# Altium PCB BLE_product-v1.0(Updated Power Jack).PcbDoc (part 1 of 2)
Units mil, origin at the board's own origin, x right, y up, seen from the top; angles counter-clockwise.
Board outline 472.44 x 507.34 mil, 4 copper layers (Top Layer, Layer 2, Layer 3, Bottom Layer), stack 39.334 mil thick; 45 components, 33 nets, 183 pads, 87 vias.
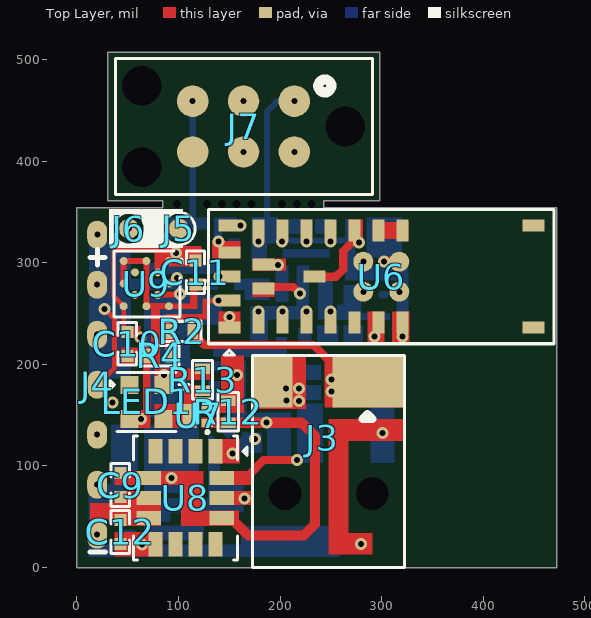
[diagram p0: Top Layer view]
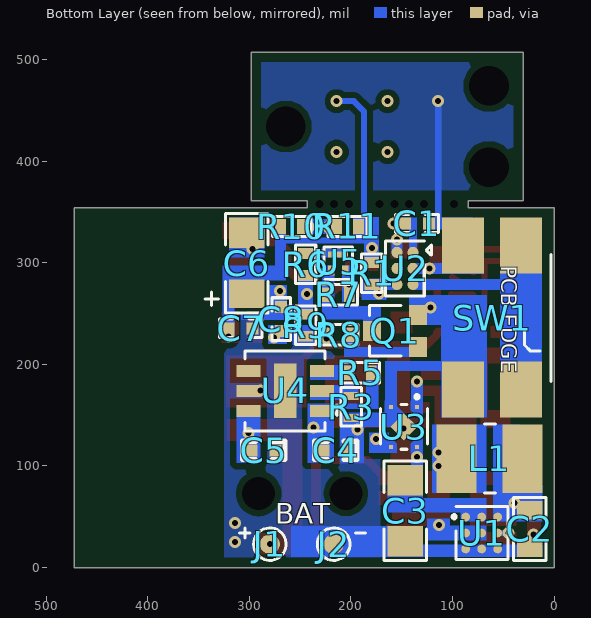
[diagram p1: Bottom Layer view, seen from below]
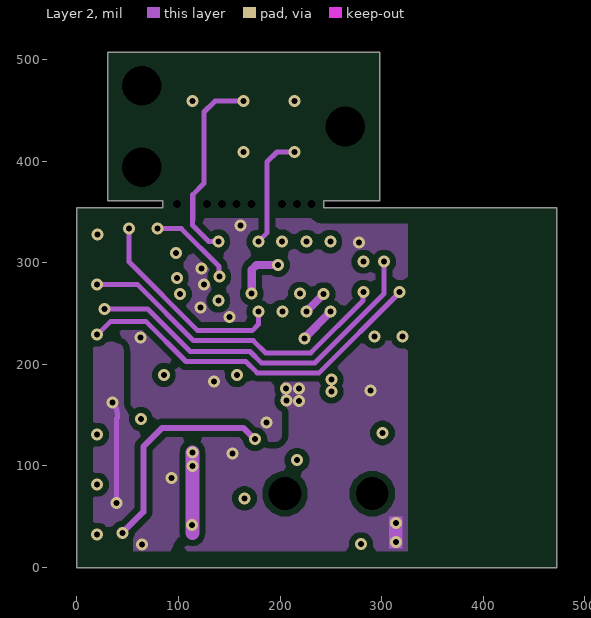
[diagram p2: Layer 2]
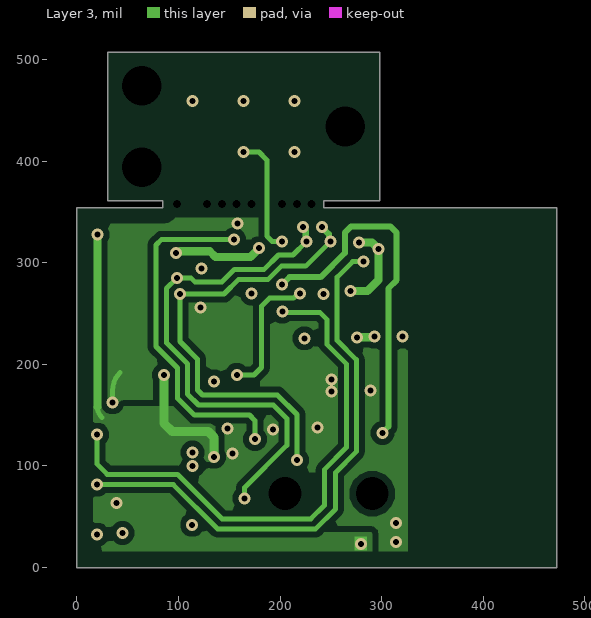
[diagram p3: Layer 3]
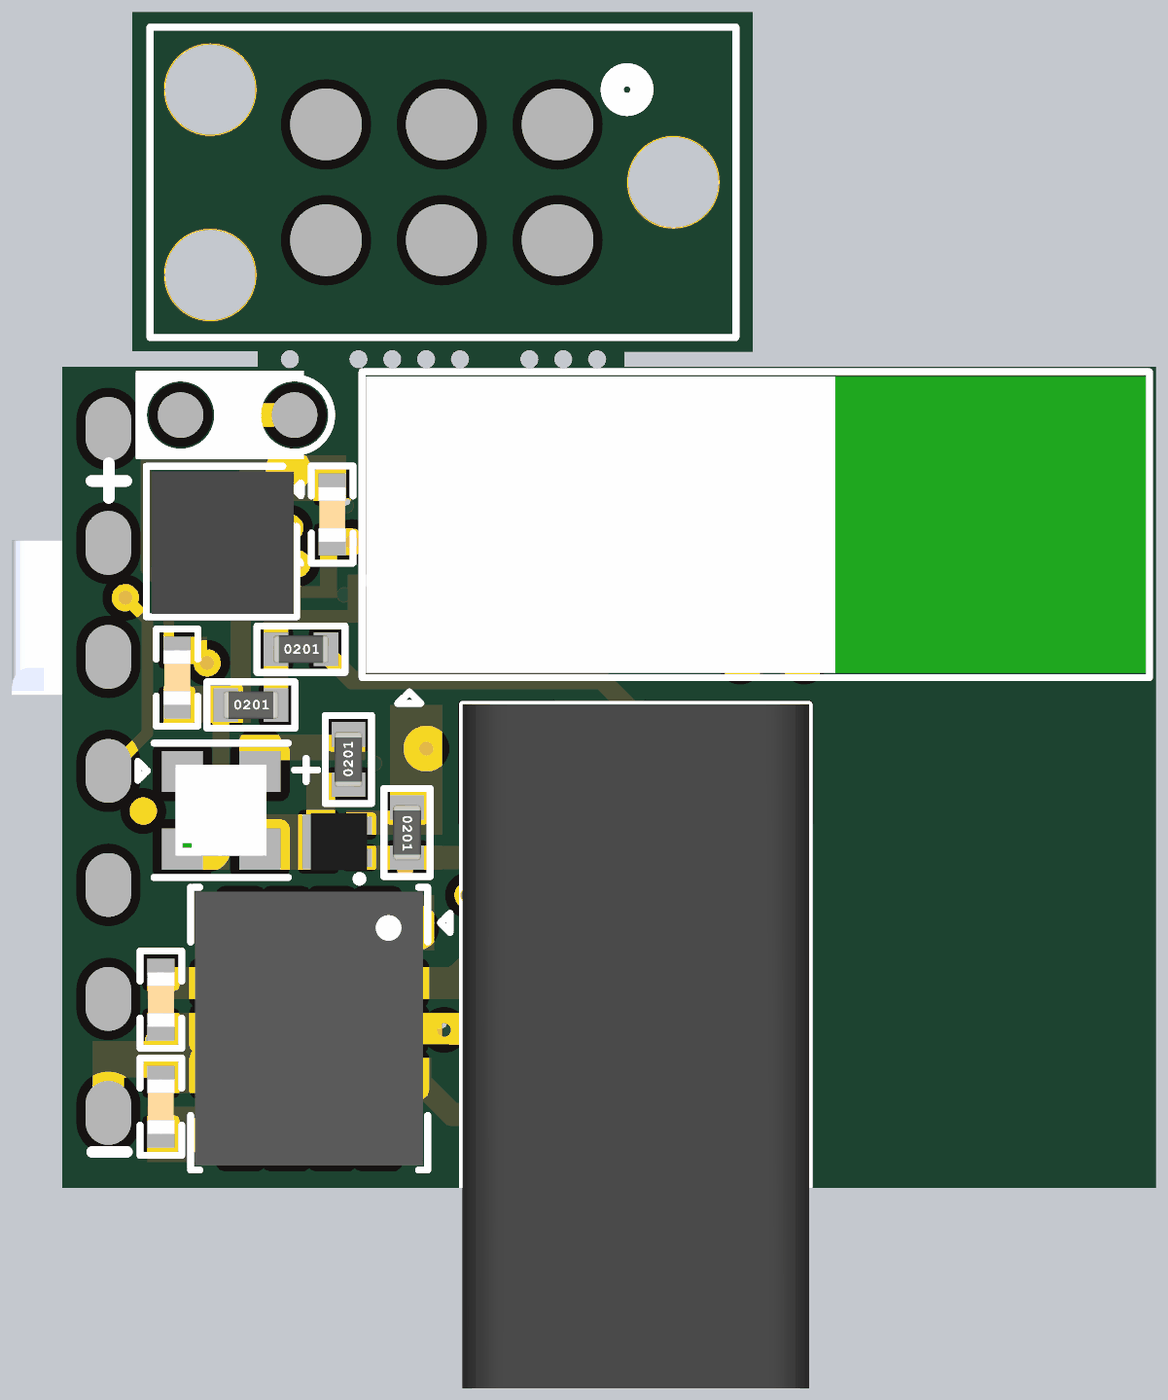
[diagram p4: 3D render of the assembled board from above, using the file's embedded part models]
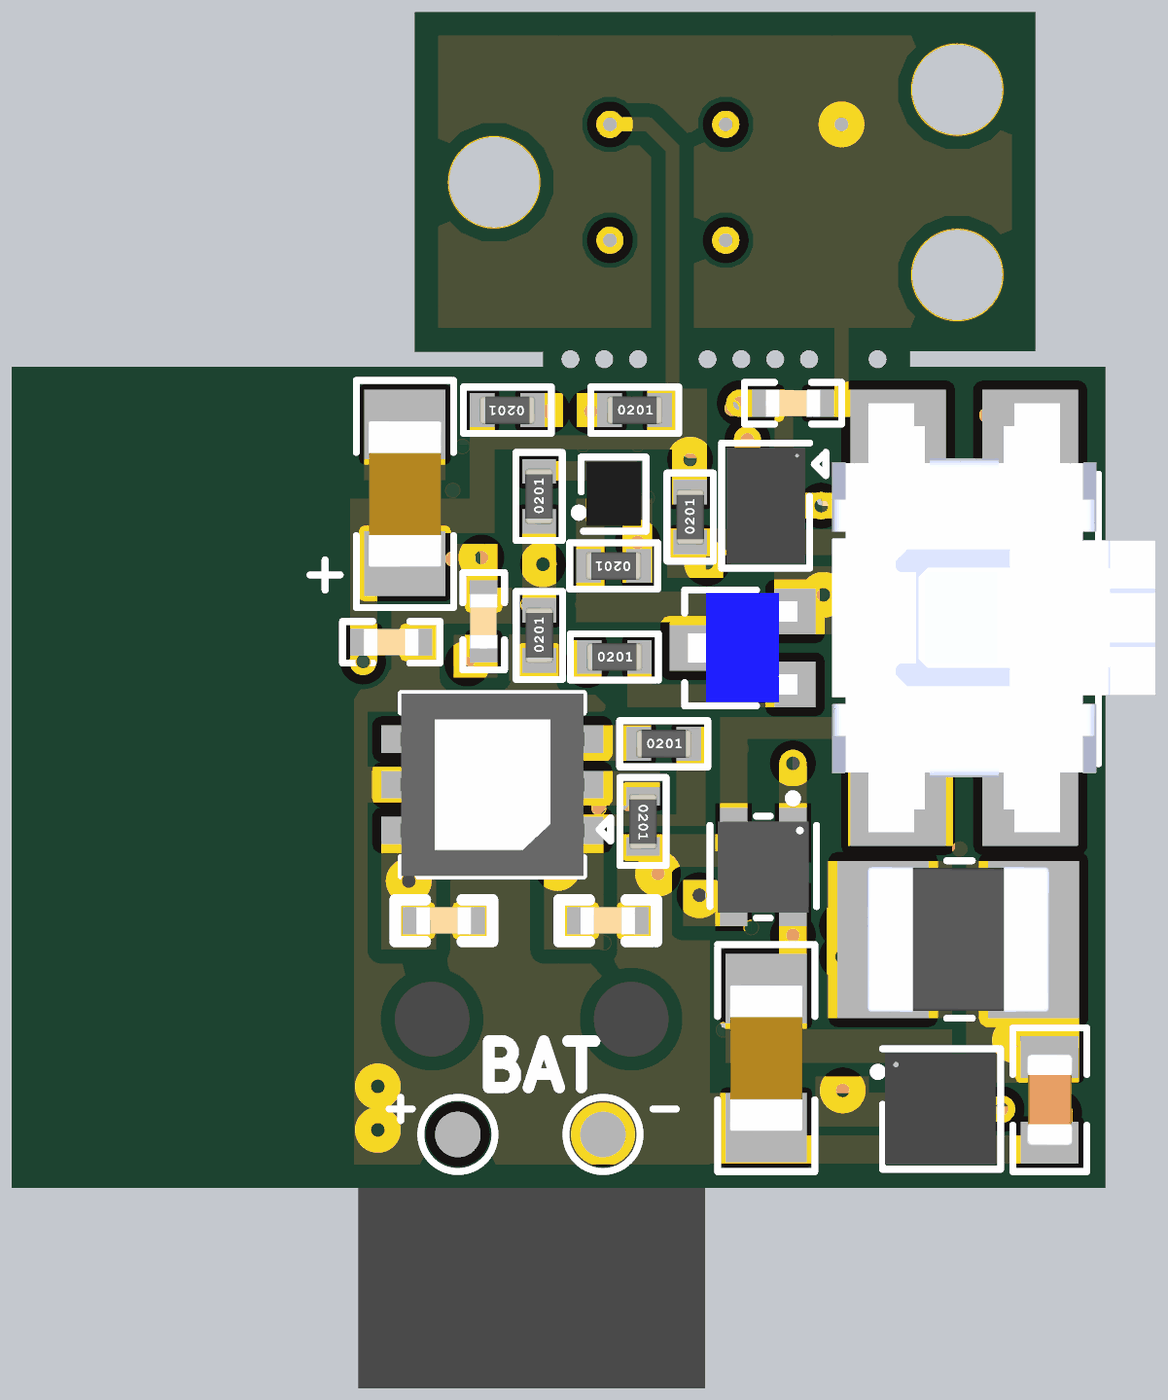
[diagram p5: 3D render of the assembled board from below, using the file's embedded part models]

## Layer stack, top to bottom
Top Solder: solder mask 0.4, Solder Resist, Dk 3.5
Top Layer: signal copper 1.378
Dielectric 2: prepreg 5.1, PP-017, Dk 4.3
Layer 2: signal copper 1.378
Dielectric 1: dielectric 23.622, FR-4, Dk 4.8
Layer 3: signal copper 1.378
Dielectric 3: prepreg 5.1, PP-017, Dk 4.3
Bottom Layer: signal copper 1.378
Bottom Solder: solder mask 0.4, Solder Resist, Dk 3.5

## Board outline
0,0 0,354.33 84.47,354.33 84.47,361 30.33,361 30.33,507.34 298.25,507.34 298.25,360.92 242.75,360.92 242.75,354.33 472.44,354.33 472.44,0

## Design rules (kind name [scope] priority, off if disabled: settings)
BoardOutlineClearance BoardOutlineClearance_OUTER [(OnLayer('Top Layer') OR OnLayer('Bottom Layer'))] p1: gap=9.84 ignorepadtopadclearanceinfootprint=FALSE except(0: Arc-SplitContinuation Track-SplitContinuation SMDPad-SplitContinuation THPad-SplitContinuation Via-SplitContinuation Fill-SplitContinuation Poly-SplitContinuation Region-SplitContinuation Text-SplitContinuation)
BoardOutlineClearance BoardOutlineClearance_INNER [(OnLayer('Layer 2') OR OnLayer('Layer 3'))] p2: gap=15.75 ignorepadtopadclearanceinfootprint=FALSE except(0: Arc-SplitContinuation Track-SplitContinuation SMDPad-SplitContinuation THPad-SplitContinuation Via-SplitContinuation Fill-SplitContinuation Poly-SplitContinuation Region-SplitContinuation Text-SplitContinuation)
Clearance Clearance_LAYER3 [OnLayer('Layer 3')] p1: gap=4.92 ignorepadtopadclearanceinfootprint=FALSE except(6: Arc-Poly Track-Poly SMDPad-Poly THPad-Poly Via-Poly Fill-Poly Poly-Poly)
Clearance Clearance_LAYER2 [OnLayer('Layer 2')] p2: gap=4.92 ignorepadtopadclearanceinfootprint=FALSE except(6: Arc-Poly Track-Poly SMDPad-Poly THPad-Poly Via-Poly Fill-Poly Poly-Poly)
Clearance Clearance_BOTTOM [OnLayer('Bottom Layer')] p3: gap=3.54 ignorepadtopadclearanceinfootprint=FALSE except(6: Arc-Poly Track-Poly SMDPad-Poly THPad-Poly Via-Poly Fill-Poly Poly-Poly)
Clearance Clearance_TOP [OnLayer('Top Layer')] p4: gap=3.54 ignorepadtopadclearanceinfootprint=FALSE except(6: Arc-Poly Track-Poly SMDPad-Poly THPad-Poly Via-Poly Fill-Poly Poly-Poly)
ComponentClearance [All] p1: gap=0 collisioncheckmode=3 verticalgap=0 showdistances=FALSE
HoleToHoleClearance [All] p1: gap=5 allowstackedmicrovias=TRUE
MinimumSolderMaskSliver [All] p1: minsoldermaskwidth=0
PolygonConnect PolygonConnect_TOP [HasFootprint('TC2030-IDC-NL_')] p1: connectstyle=Relief reliefconductorwidth=5 reliefentries=4 polygonreliefangle="90 Angle" airgapwidth=5
PolygonConnect [All] p2: connectstyle=Direct reliefconductorwidth=4 reliefentries=4 polygonreliefangle="90 Angle" airgapwidth=4
RoutingVias [All] p1: holewidth=5.91 width=11.81 viastyle="Through Hole" minholewidth=5.91 minwidth=11.81 maxholewidth=5.91 maxwidth=11.81
SilkToSilkClearance [All] p1: silktosilkclearance=0
SilkToSolderMaskClearance [IsPad] p1: minsilkscreentomaskgap=0 clearancetoexposedcopper=TRUE
SolderMaskExpansion [All] p1: expansion=4 istentingtop=FALSE
Width [All] p1: maxlimit=15 minlimit=3.54 preferedwidth=5.91 midlayer1_minwidth=4.92 midlayer2_minwidth=4.92 minimp=50.000000 maximp=50.000000 favimp=50.000000
25 further rules are at their usual default settings.

## Classes and differential pairs
component class U_Power_Sheet: C1 C2 C3 C4 C5 J1 J2 J3 L1 Q1 R1 R2 R3 R4 R5 R6 R7 R8 R9 SW1 U1 U2 U3 U4 U5
component class U_IMU_Sensor_Sheet: C9 C10 C11 C12 U8 U9
component class U_BLE_Module_Sheet: 2 C6 C7 C8 J4 J5 J6 J7 LED1 R10 R11 R12 R13 U6 U7

## Components (designator, comment, footprint, x,y, rotation, side; value= is the part's Value field where it differs from the comment)
C1 "0.1uF" CAP-0201 134.92,338.65 r0 bottom
C2 "10uF" Cap-0402 24.04,37.93 r90 bottom
C3 "22uF" Cap-0603 146.51,55.93 r90 bottom
C4 "1uF" CAP-0201 214.93,115.26 r0 bottom
C5 "2.2uf" CAP-0201 285.73,115.26 r0 bottom value=2.2uF
C6 "100uF" F980J107MMAAXE 302.53,269.45 r90 bottom
C7 "0.1uF" CAP-0201 308.43,235.45 r0 bottom
C8 "1uF" CAP-0201 268.54,244.5 r270 bottom
C9 "0.1uF" CAP-0201 42.69,81.19 r90 top
C10 "0.1uF" CAP-0201 49.66,220.2 r90 top
C11 "0.1uF" CAP-0201 116.67,290.58 r90 top
C12 "0.1uF" CAP-0201 42.69,34.98 r270 top
J1 "1 Sensor Pad 0.5mm" "1 Sensor Pad 0.5mm" 279.67,22.97 r180 bottom
J2 "1 Sensor Pad 0.5mm" "1 Sensor Pad 0.5mm" 217,22.97 r180 bottom
J3 "DC-096" DC-096 241.73,127.87 r270 top
J4 "Sensor Pads 0.5mm Dia" "Sensor-Pads 0.5mm Dia" 20,179.91 r270 top locked
J5 "1 Sensor Pad 0.5mm" "1 Sensor Pad 0.5mm" 100.42,333.51 r90 top
J6 "1 Sensor Pad 0.5mm" "1 Sensor Pad 0.5mm" 51.21,333.51 r90 top
J7 "TC2030-IDC-NL" TC2030-IDC-NL_ 164,434 r180 top
L1 "470nH" IND-0806 63.54,107.14 r180 bottom
LED1 "XL-1010RGBC-WS2812B" XL-1010RGBC-WS2812B 68.7,162.91 r0 top
Q1 "MMBT3904M" SOT-723 156.73,233 r90 bottom
R1 "10K" Res-0201#1 179.37,289.49 r90 bottom
R2 "22K" Res-0201#1 103.2,232.4 r0 top
R3 "10K" Res-0201#2 199.73,158.06 r270 bottom
R4 "33k" Res-0201#1 81.55,208.37 r0 top
R5 "10K" Res-0201#1 190.75,191.62 r180 bottom
R6 "100K" Res-0201#1 244.57,298.38 r90 bottom
R7 "4.7K" Res-0201#1 212.39,268.42 r0 bottom
R8 "4.7K" Res-0201#1 212.07,229.09 r180 bottom
R9 "100K" Res-0201#1 244.49,238.41 r90 bottom
R10 "4.7K" Res-0201#1 258.3,335.65 r0 bottom
R11 "4.7K" Res-0201#1 203.31,335.65 r180 bottom
R12 "10K" Res-0201#1 148.97,153.32 r270 top
R13 "10K" Res-0201#1 123.67,184.83 r90 top
SW1 "EVQ-P7A01P" EVQP7A01P 61,246 r90 bottom locked
U1 "FAN48610UC50X" "WLCSP-9 (1.22x1.22)" 71.29,33.97 r180 bottom
U2 "MAX16150AWT+" WLP-6(0.83x1.24) 146.76,294.41 r270 bottom
U3 "TLV73330PDQNR" X2-SON-4(1x1) 147.78,138.38 r270 bottom
U4 "FAN54120UC420X" DFN-6-EP(2x2) 264.76,173.93 r0 bottom
U5 "CSD25501F3" PicoStar-3 212.41,300.39 r180 bottom
U6 "EYSHSNZWZ" EYSHSNZWZ 299.58,286.24 r0 top locked
U7 "NTNS3193NZT5G" X-LLGA-3 119.56,149.32 r90 top
U8 "BMI323" "14-LGA (2.5x3)" 106.71,68.64 r270 top locked
U9 "BMM150" "12-WLCSP (1.56x1.56)" 68.35,279.43 r0 top locked

## Footprints (in the part's own frame and the unit in brackets; to place one, negate y for a bottom-side part, rotate by r counter-clockwise, add the part's x,y. Pads: shape width x height; smd on the part's side, far side on the other; paste and mask are expansions set on the pad)
"1 Sensor Pad 0.5mm" [mm]
  round 0.5 smd: 1(0,0)
  silkscreen extent -0.41,-0.41 0.4,0.41
"12-WLCSP (1.56x1.56)" [mm]
  round 0.2 smd mask+0.05: A1(0.566,0.566) A3(0.566,0) A5(0.566,-0.566) B2(0.283,0.283) B4(0.283,-0.283) C1(0,0.566) C5(0,-0.566) D2(-0.283,0.283) D4(-0.283,-0.283) E1(-0.566,0.566) E3(-0.566,0) E5(-0.566,-0.566)
  silkscreen extent -0.81,-0.84 0.89,0.81, body extent -0.75,-0.81 0.81,0.75, height 0.6
"14-LGA (2.5x3)" [mm]
  rect 0.61x0.35 smd: 1(-1.16,0.75) 2(-1.16,0.25) 3(-1.16,-0.25) 4(-1.16,-0.75) 8(1.16,-0.75) 9(1.16,-0.25) 10(1.16,0.25) 11(1.16,0.75)
  rect 0.35x0.61 smd: 5(-0.5,-0.91) 6(0,-0.91) 7(0.5,-0.91) 12(0.5,0.91) 13(0,0.91) 14(-0.5,0.91)
  silkscreen extent -1.55,-1.3 1.55,1.3, body extent -1.5,-1.25 1.5,1.25, height 0.86
CAP-0201 [mm]
  rect 0.3x0.3 smd mask+0.055: 1(-0.3,0) 2(0.3,0)
  silkscreen extent -0.53,-0.23 0.53,0.23, body extent -0.3,-0.15 0.3,0.15, height 0.28
Cap-0402 [mil]
  rect 18x25 smd mask+2.36: 1(-18.5,0) 2(18.5,0)
  silkscreen extent -31,-16 31,16, body extent -20,-10 20,10, height 19
Cap-0603 [mil]
  rect 30x35 smd mask+2.36: 1(-30,0) 2(30,0)
  silkscreen extent -49,-21 49,21, body extent -32,-16 31,16, height 34
DC-096 [mm]
  rect 1.3x1.8 smd mask+0.05: 1(-1.4,1.154)
  rect 1.3x1 smd mask+0.05: 2(-1.4,-1.246)
  round 0 hole 0.82 unplated mask+0.05: MH(1.4,1.246) MH(1.4,-0.937)
  silkscreen extent -2.05,-1.75 -0.46,2.05, body extent -2.05,-1.75 5.45,2.05, height 3.8
DFN-6-EP(2x2) [mm]
  rect 0.6x0.3 smd: 1(-0.917,0.5) 2(-0.917,0) 3(-0.917,-0.5) 4(0.918,-0.5) 5(0.918,0) 6(0.918,0.5)
  rect 0.56x1.37 smd: 7(0,0)
  silkscreen extent -1,-1 1,1, body extent -1.01,-1 1.01,1, height 0.76
EVQP7A01P [mm]
  rect 1.4x1.05 smd: 1(-1.8,0.725) 1(1.8,0.725) 2(-1.8,-0.725) 2(1.8,-0.725)
  silkscreen extent -1.6,-1.47 1.57,-0.81, body extent -2.35,-2.1 2.35,1.45, height 1.35
EYSHSNZWZ [mm]
  rect 0.55x0.3 smd: 1(-3.8,-1.275) 18(-3.8,1.275) 19(-3.8,0.6) 20(-3.8,0) 21(-3.8,-0.6) 22(-2.95,-0.3) 25(-2.95,0.3) 26(-1.675,0) 27(3.8,-1.275) 28(3.8,1.275)
  rect 0.3x0.55 smd: 2(-3.075,-1.15) 3(-2.475,-1.15) 4(-1.875,-1.15) 5(-1.275,-1.15) 6(-0.675,-1.15) 7(-0.075,-1.15) 8(0.525,-1.15) 11(0.525,1.15) 12(-0.075,1.15) 13(-0.675,1.15) 14(-1.275,1.15) 15(-1.875,1.15) 16(-2.475,1.15) 17(-3.075,1.15)
  round 0.5 smd: 9(0.45,-0.375) 10(0.45,0.375) 23(-0.45,-0.375) 24(-0.45,0.375)
  silkscreen extent -4.32,-1.68 4.32,1.68, body extent -4.28,-1.63 4.28,1.63, height 0.85
F980J107MMAAXE [mil]
  rect 28x35 smd mask+2.36: 1(0,0)
  rect 30x35 smd mask+2.36: 2(60,0)
  silkscreen extent -19,-21 79,21, body extent -2,-16 61,16, height 34
IND-0806 [mm]
  rect 1x1.72 smd: 1(-0.825,0) 2(0.825,0)
  silkscreen extent -0.13,-0.86 0.15,0.86, body extent -1,-0.8 1,0.8, height 1.2
PicoStar-3 [mm]
  rect 0.152x0.25 smd mask+0.05: 1(-0.175,-0.2) 2(0.175,-0.2)
  rect 0.5x0.152 smd mask+0.05: 3(0,0.2)
  silkscreen extent -0.41,-0.43 0.36,0.38, body extent -0.3,-0.38 0.3,0.32, height 0.2
Res-0201#1 [mm]
  rect 0.27x0.37 smd mask+0.055: 1(-0.275,0) 2(0.275,0)
  silkscreen extent -0.48,-0.25 0.48,0.25, body extent -0.3,-0.15 0.3,0.15, height 0.29
Res-0201#2 [mm]
  rect 0.203x0.37 smd mask+0.055: 1(-0.275,0) 2(0.275,0)
  silkscreen extent -0.48,-0.25 0.48,0.25, body extent -0.3,-0.15 0.3,0.15, height 0.29
"Sensor-Pads 0.5mm Dia" [mm]
  oval 0.7x0.5 smd: 1(-3.75,0) 2(-2.5,0) 3(-1.25,0) 4(0,0) 5(1.25,0) 6(2.5,0) 7(3.75,0)
SOT-723 [mm]
  rect 0.5x0.45 smd: 1(-0.4,-0.575) 2(0.4,-0.575) 3(0,0.575)
  silkscreen extent -0.64,-0.15 0.64,0.64, body extent -0.6,-0.6 0.6,0.6, height 0.5
TC2030-IDC-NL_ [mil]
  round 30.98 smd: 1(-50,-25) 1(-50,-25) 2(-50,25) 3(0,-25) 4(0,25) 5(50,-25) 6(50,25)
  round 0 hole 39.02: MP1(-100,0) MP2(100,40) MP3(100,-40)
  silkscreen extent -127,-67 126,67
"WLCSP-9 (1.22x1.22)" [mm]
  round 0.218 smd mask+0.055: A1(-0.4,0.4) A2(0,0.4) A3(0.4,0.4) B1(-0.4,0) B2(0,0) B3(0.4,0) C1(-0.4,-0.4) C2(0,-0.4) C3(0.4,-0.4)
  silkscreen extent -0.71,-0.66 0.66,0.66, body extent -0.61,-0.61 0.61,0.61, height 0.59
WLP-6(0.83x1.24) [mm]
  round 0.28 smd mask+0.055: A1(-0.4,0.2) A2(0,0.2) A3(0.4,0.2) B1(-0.4,-0.2) B2(0,-0.2) B3(0.4,-0.2)
  silkscreen extent -0.69,-0.48 0.69,0.66, body extent -0.64,-0.43 0.64,0.43, height 0.69
X2-SON-4(1x1) [mm]
  rect 0.1x0.1 smd paste-1 mask+0: 1(-0.5,0.325) 2(-0.5,-0.325) 3(0.5,-0.325) 4(0.5,0.325)
  rect 0.48x0.48 smd rot 135: 5(0,0)
  Top Layer region: 0.42,0.175 0.22,0.375 0.22,0.475 0.65,0.475 0.65,0.175
  Top Layer region: 0.22,-0.475 0.22,-0.375 0.42,-0.175 0.65,-0.175 0.65,-0.475
  Top Layer region: -0.65,-0.475 -0.65,-0.175 -0.42,-0.175 -0.22,-0.375 -0.22,-0.475
  Top Layer region: -0.42,0.175 -0.65,0.175 -0.65,0.475 -0.12,0.475
  silkscreen extent -0.78,-0.58 0.56,0.58, body extent -0.5,-0.5 0.5,0.5, height 0.58
X-LLGA-3 [mm]
  rect 0.2x0.28 smd mask+0.05: 1(-0.175,-0.222) 2(0.175,-0.222)
  rect 0.6x0.35 smd mask+0.05: 3(0,0.223)
  silkscreen extent -0.43,-0.25 -0.38,-0.2, body extent -0.31,-0.31 0.31,0.31, height 0.29
XL-1010RGBC-WS2812B [mm]
  rect 0.45x0.45 smd: 1(-0.425,0.425) 2(0.425,0.425) 3(-0.425,-0.425) 4(0.425,-0.425)
  silkscreen extent -0.74,-0.74 0.74,0.74, body extent -0.5,-0.5 0.5,0.5, height 0.81

## Part data
C1 C7 C9 C10 C11 C12: library part CC0201KRX5R6BB104, "CAP CER 0.1UF 10V X5R 0201", Capacitance=100nF, Case Code (Imperial)=0201, Case Code (Metric)=0603, Dielectric=X5R, LCSC Part Number=C190183, Manufacturer=Yageo, Max Operating Temperature=85°C, Min Operating Temperature=-55°C, Resistor Type=Ceramic, Supplier Part Number 1=603-CC201KRX5R6BB104, Tolerance=10%, Voltage Rating=10V, Case/Package=0201, Category="Ceramic Capacitors", ComponentLink1Description=https://datasheet.ciiva.com/11587/upy-gphc-x5r-4v-to-50v-12-11587190.pdf?src-supplier=Avnet, ComponentLink1URL=https://datasheet.ciiva.com/11587/upy-gphc-x5r-4v-to-50v-12-11587190.pdf?src-supplier=Avnet, Construction=Flat, Depth=0.3mm, Halogen Free="Halogen Free", Height=0.3mm, Lead Free="Lead Free", Length=0.6mm, Manufacturer Part Number=CC0201KRX5R6BB104, Mount="Surface Mount", Packaging="Tape and Reel", Pricing 1="1=0.10000, 10=0.02400, 50=0.02400, 100=0.01900, 1000=0.01100, 10000=0.00900 (USD)", Radiation Hardening=No, RoHS=Yes, RoHS Compliant=Yes, Series=CC, Stock 1=824403, Supplier 1=Mouser, Termination=SMD/SMT, Thickness=0.013inch, Voltage Rating (DC)=10V, Weight=6E-06oz, Width=0.012inch
C2: library part CL05A106MP5NUNC, "CAP CER 10UF 10V X5R 0402", Case Code (Imperial)=0402, Case Code (Metric)=1005, Dielectric=X5R, LCSC Part Number=C315248, Manufacturer=Samsung, Max Operating Temperature=85°C, Min Operating Temperature=-55°C, Package Quantity=1, Tolerance=20%, Voltage Rating=10V, Capacitance=10uF, Case/Package=0402, Category="Ceramic Capacitors", ComponentLink1Description=https://datasheet.ciiva.com/25721/cl05a106mp5nunc-25721584.pdf?src-supplier=Digi-Key, ComponentLink1URL=https://datasheet.ciiva.com/25721/cl05a106mp5nunc-25721584.pdf?src-supplier=Digi-Key, ComponentLink2Description=https://datasheet.ciiva.com/26838/getdatasheetpartid-745310-26838170.pdf?src-supplier=Verical, ComponentLink2URL=https://datasheet.ciiva.com/26838/getdatasheetpartid-745310-26838170.pdf?src-supplier=Verical, Construction=Flat, Contact Plating=Tin, Depth=0.5mm, Item Type=Capacitor, Lead Free="Lead Free", Length=1mm, Manufacturer Part Number=CL05A106MP5NUNC, Mount="Surface Mount", Packaging="Tape and Reel", Pricing 1="10000=0.02537 (USD)", Radiation Hardening=No, RoHS=Yes, RoHS Compliant=Yes, Series=CL, Stock 1=1729850, Supplier 1=Avnet, Supplier Part Number 1=CL05A106MP5NUNC, Termination=Wraparound, Thickness=0.028inch, Width=0.02inch
C3: library part CC0603MRX5R6BB226, "CAP CER 22UF 10V X5R 0603", Case Code (Imperial)=0603, Case Code (Metric)=1608, Dielectric=X5R, LCSC Part Number=C109447, Manufacturer=Yageo, Max Operating Temperature=85°C, Min Operating Temperature=-55°C, Package Quantity=4000, Supplier Part Number 1=311-1819-1-ND, Tolerance=20%, Voltage Rating=10V, Capacitance=22uF, Case/Package=0603, Category="Ceramic Capacitors", ComponentLink1Description=http://www.mouser.com/ds/2/447/Yageo_UPY-GP_NP0_16V-to-50V_9-358835.pdf?src-supplier=Mouser, ComponentLink1URL=http://www.mouser.com/ds/2/447/Yageo_UPY-GP_NP0_16V-to-50V_9-358835.pdf?src-supplier=Mouser, ComponentLink2Description=http://www.yageo.com/documents/recent/UPY-GPHC_X5R_4V-to-50V_25.pdf?src-supplier=Digi-Key, ComponentLink2URL=http://www.yageo.com/documents/recent/UPY-GPHC_X5R_4V-to-50V_25.pdf?src-supplier=Digi-Key, Halogen Free="Halogen Free", Height=0.8mm, Item Type=Capacitor, Lead Free="Lead Free", Length=0.063inch, Manufacturer Part Number=CC0603MRX5R6BB226, Mount="Surface Mount", Packaging="Tape and Reel", Pricing 1="1=0.68000, 10=0.48000, 50=0.36300, 100=0.31610, 500=0.23416, 1000=0.19903 (USD)", RoHS=Yes, RoHS Compliant=Yes, Stock 1=19628, Supplier 1=Digi-Key, Termination=SMD/SMT, Thickness=0.035inch, Voltage Rating (DC)=10V, Weight=7.1E-05oz, Width=0.8mm
C4: library part CC0201MRX5R6BB105, "CAP CER 1UF 10V X5R 0201", LCSC Part Number=C605210, Manufacturer=Yageo, Supplier Part Number=311-3474-1-ND, Category="Ceramic Capacitors", ComponentLink1Description=https://datasheet.octopart.com/CC0201MRX5R6BB105-Yageo-datasheet-158238148.pdf?src-supplier=Farnell, ComponentLink1URL=https://datasheet.octopart.com/CC0201MRX5R6BB105-Yageo-datasheet-158238148.pdf?src-supplier=Farnell, ComponentLink2Description=http://www.yageo.com/documents/recent/UPY-GPHC_X5R_4V-to-50V_25.pdf?src-supplier=Digi-Key, ComponentLink2URL=http://www.yageo.com/documents/recent/UPY-GPHC_X5R_4V-to-50V_25.pdf?src-supplier=Digi-Key, ComponentLink3Description=https://datasheet.octopart.com/CC0201MRX5R6BB105-Yageo-datasheet-137700082.pdf?src-supplier=Future+Electronics, ComponentLink3URL=https://datasheet.octopart.com/CC0201MRX5R6BB105-Yageo-datasheet-137700082.pdf?src-supplier=Future+Electronics, Item Type=Capacitor, Manufacturer Part Number=CC0201MRX5R6BB105, Pricing="1=0.19, 10=0.135, 50=0.0764, 100=0.0633, 500=0.04436, 1000=0.03672, 2500=0.03418, 5000=0.03127 (USD)", RoHS=Yes, Stock=772400, Supplier=Digi-Key
C5: library part CC0201MRX5R6BB225, "CAP CER 2.2UF 10V X5R 0201", Case/Package=0201, LCSC Part Number=C2186869, Manufacturer=Yageo, Max Operating Temperature=85°C, Min Operating Temperature=-55°C, Supplier Part Number=603-CC0201MRX56BB225, Tolerance=20%, Voltage Rating=10V, Category="Ceramic Capacitors", ComponentLink1Description=https://www.yageo.com/upload/media/product/productsearch/datasheet/mlcc/UPY-GPHC_X5R_4V-to-50V_26.pdf?src-supplier=Digi-Key, ComponentLink1URL=https://www.yageo.com/upload/media/product/productsearch/datasheet/mlcc/UPY-GPHC_X5R_4V-to-50V_26.pdf?src-supplier=Digi-Key, Item Type=Capacitor, Manufacturer Part Number=CC0201MRX5R6BB225, Mounting Technology="Surface Mount", Packaging="Tape and Reel", Pricing="1=0.43, 10=0.294, 50=0.294, 100=0.176, 1000=0.112, 10000=0.091 (USD)", RoHS=Yes, RoHS Compliant=Yes, Series=CC, Stock=25553, Supplier=Mouser
C6: library part F980J107MMAAXE, "CAP TANT 100UF 20% 6.3V 0603", LCSC Part Number=C1955164, Manufacturer="Kyocera AVX", Supplier Part Number=478-9836-1-ND, Category="Tantalum Capacitors", ComponentLink1Description=http://www.farnell.com/datasheets/2602422.pdf?src-supplier=Farnell, ComponentLink1URL=http://www.farnell.com/datasheets/2602422.pdf?src-supplier=Farnell, ComponentLink2Description=https://datasheet.octopart.com/F980J107MMAAXE-AVX-datasheet-104407997.pdf?src-supplier=Newark, ComponentLink2URL=https://datasheet.octopart.com/F980J107MMAAXE-AVX-datasheet-104407997.pdf?src-supplier=Newark, ComponentLink3Description=https://datasheet.octopart.com/F980J107MMAAXE-KYOCERA-AVX-datasheet-57254939.pdf?src-supplier=Future+Electronics, ComponentLink3URL=https://datasheet.octopart.com/F980J107MMAAXE-KYOCERA-AVX-datasheet-57254939.pdf?src-supplier=Future+Electronics, ComponentLink4Description=http://datasheets.avx.com/F98.pdf?src-supplier=Digi-Key, ComponentLink4URL=http://datasheets.avx.com/F98.pdf?src-supplier=Digi-Key, ComponentLink5Description=http://www.farnell.com/datasheets/2649022.pdf?src-supplier=Newark, ComponentLink5URL=http://www.farnell.com/datasheets/2649022.pdf?src-supplier=Newark, Item Type=Capacitor, Manufacturer Part Number=F980J107MMAAXE, Pricing="1=0.71, 10=0.505, 50=0.382, 100=0.3327, 500=0.24644, 1000=0.20947 (USD)", RoHS=Yes, Stock=133089, Supplier=Digi-Key
C8: library part CC0201MRX5R7BB105, "CAP CER 1UF 16V X5R 0201", LCSC Part Number=C5182464, Manufacturer=Yageo, Supplier Part Number=13-CC0201MRX5R7BB105TR-ND, Category="Ceramic Capacitors", Item Type=Capacitor, Manufacturer Part Number=CC0201MRX5R7BB105, RoHS=Yes, Supplier=Digi-Key
J1 J2 J5 J6: "Wire Connecting Pad 0.5mm", Item Type="SMD Pad", Manufacturer Part Number="1 Sensor Pad 0.5mm"
J3: "DC Power Jack Socket Female Panel Mount Connector", Manufacturer="CW Switch Elec. Store", Item Type="DC Jack Female", Manufacturer Part Number=DC-096
J4: "Wire Connecting Pad", Manufacturer Part Number="Sensor Pads", Item Type="SMD Pads"
L1: library part 1286AS-H-R47M=P2, "FIXED IND 470NH 3.4A 52 MOHM SMD", Case Code (Imperial)=0806, Case Code (Metric)=2016, Current Rating=3.4A, DC Resistance (DCR)=52mR, LCSC Part Number=C160957, Manufacturer=Murata, Manufacturer Part Number=1286AS-H-R47M=P2, Max DC Current=3.8A, Max Operating Temperature=85°C, Min Operating Temperature=-40°C, Supplier Part Number=490-10606-1-ND, Test Frequency=1MHz, Tolerance=20%, Case/Package=0806, Category="Fixed Inductors", ComponentLink1Description=http://www.farnell.com/datasheets/2021974.pdf?src-supplier=Farnell, ComponentLink1URL=http://www.farnell.com/datasheets/2021974.pdf?src-supplier=Farnell, ComponentLink2Description=http://www.toko.co.jp/products/pdf/inductors/dfe201612c.pdf?src-supplier=Avnet, ComponentLink2URL=http://www.toko.co.jp/products/pdf/inductors/dfe201612c.pdf?src-supplier=Avnet, ComponentLink3Description=http://search.murata.co.jp/Ceramy/image/img/P02/J(E)TE243A-0010_DFE201612C_reference.pdf?src-supplier=Digi-Key, ComponentLink3URL=http://search.murata.co.jp/Ceramy/image/img/P02/J(E)TE243A-0010_DFE201612C_reference.pdf?src-supplier=Digi-Key, ComponentLink4Description=http://www.toko.co.jp/products/pdf/inductors/dfe201612c.pdf?src-supplier=Digi-Key, ComponentLink4URL=http://www.toko.co.jp/products/pdf/inductors/dfe201612c.pdf?src-supplier=Digi-Key, Core Material=Ferrite, Depth=1.6mm, Height - Seated (Max)=0.047inch, Item Type=Inductor, Length=0.079inch, Mounting Technology="Surface Mount", Packaging="Cut Tape", Pricing="1=0.39, 10=0.348, 25=0.3048, 50=0.2612, 100=0.2394, 250=0.21764, 500=0.2046, 1000=0.15671 (USD)", RoHS=Yes, RoHS Compliant=Yes, Series=DFE201612C, Shielding=Shielded, Stock=12493, Supplier=Digi-Key, Width=0.063inch
LED1: "Colorless transparence -40℃~+150℃ 正贴 RGB 120° 1010 Light Emitting Diodes (LED) ROHS", LCSC Part Number=C5349953, Manufacturer=XINGLIGHT, Package=1010, ComponentLink1Description=LCSC, ComponentLink1URL=https://www.lcsc.com/product-detail/Light-Emitting-Diodes-LED_XINGLIGHT-XL-1010RGBC-WS2812B_C5349953.html, Item Type="RGB LED", Manufacturer Part Number=XL-1010RGBC-WS2812B
Q1: "40V 100mW 100@10mA,1V 200mA 300MHz 300mV@50mA,5mA NPN -55℃~+150℃@(Tj) SOT-723 Bipolar Transistors - BJT ROHS", LCSC Part Number=C2923360, Manufacturer="TECH PUBLIC", Package=SOT-723, ComponentLink1Description=LCSC, ComponentLink1URL=https://www.lcsc.com/product-detail/Bipolar-Transistors-BJT_TECH-PUBLIC-MMBT3904M_C2923360.html, Item Type=Mosfet, Manufacturer Part Number=MMBT3904M
R1 R3 R5 R12 R13: library part RC0201JR-0710KL, "RES SMD 10K OHM 5% 1/20W 0201", Case Code (Imperial)=0201, Case Code (Metric)=0603, LCSC Part Number=C138117, Manufacturer=Yageo, Max Operating Temperature=125°C, Min Operating Temperature=-55°C, Power Rating=50mW, Resistance=10kR, Resistor Type="Thick Film", Supplier Part Number 1=311-10KNCT-ND, Temperature Coefficient=200ppm/°C, Tolerance=5%, Voltage Rating=25V, Case/Package=0201, Category="Chip SMD Resistors", ComponentLink1Description="New link", ComponentLink2Description=https://datasheet.ciiva.com/8891/pyu-rc0201-51-rohs-l-8-8891388.pdf?src-supplier=Avnet, ComponentLink2URL=https://datasheet.ciiva.com/8891/pyu-rc0201-51-rohs-l-8-8891388.pdf?src-supplier=Avnet, ComponentLink3Description=https://datasheet.ciiva.com/7672/1563626-7672253.pdf?src-supplier=Element14, ComponentLink3URL=https://datasheet.ciiva.com/7672/1563626-7672253.pdf?src-supplier=Element14, ComponentLink4Description=https://datasheet.ciiva.com/28405/pyu-rc0201-51-rohs-l-8-28405613.pdf?src-supplier=Avnet+Europe, ComponentLink4URL=https://datasheet.ciiva.com/28405/pyu-rc0201-51-rohs-l-8-28405613.pdf?src-supplier=Avnet+Europe, ComponentLink5Description=https://datasheet.ciiva.com/7672/1563626-7672254.pdf?src-supplier=Element14, ComponentLink5URL=https://datasheet.ciiva.com/7672/1563626-7672254.pdf?src-supplier=Element14, ComponentLink6Description=https://datasheet.ciiva.com/7660/1421516-7660810.pdf?src-supplier=Element14, ComponentLink6URL=https://datasheet.ciiva.com/7660/1421516-7660810.pdf?src-supplier=Element14, ComponentLink7Description=https://datasheet.ciiva.com/16856/pyu-rc0201-51-rohs-l-8-16856011.pdf?src-supplier=Avnet+Europe, ComponentLink7URL=https://datasheet.ciiva.com/16856/pyu-rc0201-51-rohs-l-8-16856011.pdf?src-supplier=Avnet+Europe, ComponentLink8Description=https://datasheet.ciiva.com/46391/1421516-46391291.pdf?src-supplier=Element14, ComponentLink8URL=https://datasheet.ciiva.com/46391/1421516-46391291.pdf?src-supplier=Element14, Contact Plating=Tin,Matte, Depth=0.3mm, Lead Free="Lead Free", Length=0.6mm, Manufacturer Part Number=RC0201JR-0710KL, Military Standard=Not, Packaging="Tape and Reel", Pricing 1="1=0.10000, 10=0.02600, 100=0.01050, 1000=0.00472, 2500=0.00410, 5000=0.00338 (USD)", Radiation Hardening=No, REACH SVHC=Unknown, RoHS=Yes, Stock 1=1488597, Supplier 1=Digi-Key, Termination=SMD/SMT, Voltage Rating (DC)=25V
R2: library part 0201WMF2202TEE, "50mW Thick Film Resistors ±1% ±200ppm/℃ 22kΩ 0201 Chip Resistor - Surface Mount ROHS", LCSC Part Number=C473469, Manufacturer=UNI-ROYAL, Package=0201, ComponentLink1Description=LCSC, ComponentLink1URL=https://www.lcsc.com/product-detail/Chip-Resistor-Surface-Mount_UNI-ROYAL-Uniroyal-Elec-0201WMF2202TEE_C473469.html, Item Type=Resistor, Manufacturer Part Number=0201WMF2202TEE
R4: library part 0201WMF3302TEE, "50mW Thick Film Resistors ±1% ±200ppm/℃ 33kΩ 0201 Chip Resistor - Surface Mount ROHS", LCSC Part Number=C473534, Manufacturer=UNI-ROYAL, Package=0201, ComponentLink1Description=LCSC, ComponentLink1URL=https://www.lcsc.com/product-detail/Chip-Resistor-Surface-Mount_UNI-ROYAL-Uniroyal-Elec-0201WMF3302TEE_C473534.html, Item Type=Resistor, Manufacturer Part Number=0201WMF3302TEE
R6 R9: library part 0201WMD1003TEE, "50mW Thick Film Resistors ±0.5% 100kΩ 0201 Chip Resistor - Surface Mount ROHS", LCSC Part Number=C778396, Manufacturer=UNI-ROYAL, Package=0201, ComponentLink1Description=LCSC, ComponentLink1URL=https://www.lcsc.com/product-detail/Chip-Resistor-Surface-Mount_UNI-ROYAL-Uniroyal-Elec-0201WMD1003TEE_C778396.html, Item Type=Resistor, Manufacturer Part Number=0201WMD1003TEE
R7 R8 R10 R11: library part RC0201FR-074K7L, "RES 4.7K OHM 1% 1/20W 0201", LCSC Part Number=C138135, Manufacturer=Yageo, Supplier Part Number=7537285, Category="Chip SMD Resistors", ComponentLink1Description=https://datasheet.ciiva.com/2493/pyu-r-int-thick-7-2493811.pdf?src-supplier=Digi-Key, ComponentLink1URL=https://datasheet.ciiva.com/2493/pyu-r-int-thick-7-2493811.pdf?src-supplier=Digi-Key, ComponentLink2Description=https://datasheet.ciiva.com/2493/pyu-r-int-thick-7-2493812.pdf?src-supplier=Digi-Key, ComponentLink2URL=https://datasheet.ciiva.com/2493/pyu-r-int-thick-7-2493812.pdf?src-supplier=Digi-Key, ComponentLink3Description=https://datasheet.ciiva.com/2493/pyu-r-int-thick-7-2493813.pdf?src-supplier=Digi-Key, ComponentLink3URL=https://datasheet.ciiva.com/2493/pyu-r-int-thick-7-2493813.pdf?src-supplier=Digi-Key, ComponentLink4Description=https://datasheet.ciiva.com/8892/pyu-rc0201-51-rohs-l-8-8892942.pdf?src-supplier=Avnet, ComponentLink4URL=https://datasheet.ciiva.com/8892/pyu-rc0201-51-rohs-l-8-8892942.pdf?src-supplier=Avnet, ComponentLink5Description=https://datasheet.ciiva.com/7672/1563626-7672233.pdf?src-supplier=Element14, ComponentLink5URL=https://datasheet.ciiva.com/7672/1563626-7672233.pdf?src-supplier=Element14, Item Type=Resistor, Manufacturer Part Number=RC0201FR-074K7L, Pricing="10000=0.0014, 50000=0.0013, 250000=0.0013, 750000=0.0012, 2000000=0.0011 (USD)", RoHS=Yes, Stock=1610000, Supplier="Future Electronics"
SW1: "SWITCH TACTILE SPST-NO 0.05A 12V", Actuator Color=Black, Case/Package=SMD/SMT, Contact Current Rating=50mA, Contact Resistance=500mR, LCSC Part Number=C79167, Manufacturer=Panasonic, Max Operating Temperature=70°C, Max Voltage Rating (DC)=12V, Min Operating Temperature=-20°C, Operating Force=2.2N, Package Quantity=5000, Supplier Part Number=667-EVQP7A01P, Actuator Length=0.65mm, Category="Tactile Switches", ComponentLink1Description=http://uk.rs-online.com/webdocs/13a5/0900766b813a5dbe.pdf?src-supplier=Rs, ComponentLink1URL=http://uk.rs-online.com/webdocs/13a5/0900766b813a5dbe.pdf?src-supplier=Rs, ComponentLink2Description=http://datasheet.octopart.com/EVQ-P7A01P-Panasonic-datasheet-98950114.pdf?src-supplier=Rs, ComponentLink2URL=http://datasheet.octopart.com/EVQ-P7A01P-Panasonic-datasheet-98950114.pdf?src-supplier=Rs, ComponentLink3Description=https://www3.panasonic.biz/ac/e_download/control/switch/light-touch/catalog/sw_lt_eng_3529s_side.pdf?src-supplier=Verical, ComponentLink3URL=https://www3.panasonic.biz/ac/e_download/control/switch/light-touch/catalog/sw_lt_eng_3529s_side.pdf?src-supplier=Verical, ComponentLink4Description=https://www3.panasonic.biz/ac/e_download/control/switch/light-touch/catalog/sw_lt_eng_3529s_side.pdf?src-supplier=Onlinecomponents.com, ComponentLink4URL=https://www3.panasonic.biz/ac/e_download/control/switch/light-touch/catalog/sw_lt_eng_3529s_side.pdf?src-supplier=Onlinecomponents.com, ComponentLink5Description=https://www3.panasonic.biz/ac/e_download/control/switch/light-touch/catalog/sw_lt_eng_3529s_side.pdf?src-supplier=Arrow+Electronics, ComponentLink5URL=https://www3.panasonic.biz/ac/e_download/control/switch/light-touch/catalog/sw_lt_eng_3529s_side.pdf?src-supplier=Arrow+Electronics, ComponentLink6Description=https://www3.panasonic.biz/ac/e_download/control/switch/light-touch/catalog/sw_lt_eng_3529s_side.pdf?src-supplier=Avnet, ComponentLink6URL=https://www3.panasonic.biz/ac/e_download/control/switch/light-touch/catalog/sw_lt_eng_3529s_side.pdf?src-supplier=Avnet, ComponentLink7Description=http://www.farnell.com/datasheets/1790605.pdf?src-supplier=Newark, ComponentLink7URL=http://www.farnell.com/datasheets/1790605.pdf?src-supplier=Newark, ComponentLink8Description=https://datasheet.octopart.com/EVQ-P7A01P-Panasonic-datasheet-98950114.pdf?src-supplier=Future+Electronics, ComponentLink8URL=https://datasheet.octopart.com/EVQ-P7A01P-Panasonic-datasheet-98950114.pdf?src-supplier=Future+Electronics, ComponentLink9Description=https://www3.panasonic.biz/ac/e_download/control/switch/light-touch/catalog/sw_lt_eng_3529s_side.pdf?src-supplier=Mouser, ComponentLink9URL=https://www3.panasonic.biz/ac/e_download/control/switch/light-touch/catalog/sw_lt_eng_3529s_side.pdf?src-supplier=Mouser, ComponentLink10Description=https://www3.panasonic.biz/ac/e_download/control/switch/light-touch/catalog/sw_lt_eng_3529s_side.pdf?src-supplier=Allied+Electronics, ComponentLink10URL=https://www3.panasonic.biz/ac/e_download/control/switch/light-touch/catalog/sw_lt_eng_3529s_side.pdf?src-supplier=Allied+Electronics, ComponentLink11Description=http://datasheet.octopart.com/EVQ-P7A01P-Panasonic-datasheet-98950114.pdf?src-supplier=Future+Electronics, ComponentLink11URL=http://datasheet.octopart.com/EVQ-P7A01P-Panasonic-datasheet-98950114.pdf?src-supplier=Future+Electronics, ComponentLink12Description=http://datasheet.octopart.com/EVQ-P7A01P-Panasonic-datasheet-98950114.pdf?src-supplier=Distrelec, ComponentLink12URL=http://datasheet.octopart.com/EVQ-P7A01P-Panasonic-datasheet-98950114.pdf?src-supplier=Distrelec, ComponentLink13Description=http://datasheet.octopart.com/EVQ-P7A01P-Panasonic-datasheet-98950114.pdf?src-supplier=Farnell, ComponentLink13URL=http://datasheet.octopart.com/EVQ-P7A01P-Panasonic-datasheet-98950114.pdf?src-supplier=Farnell, ComponentLink14Description=http://www.farnell.com/datasheets/1790605.pdf?src-supplier=Element14, ComponentLink14URL=http://www.farnell.com/datasheets/1790605.pdf?src-supplier=Element14, ComponentLink15Description=http://industrial.panasonic.com/www-data/pdf/ATK0000/ATK0000CE20.pdf?src-supplier=Farnell, ComponentLink15URL=http://industrial.panasonic.com/www-data/pdf/ATK0000/ATK0000CE20.pdf?src-supplier=Farnell, ComponentLink16Description=http://datasheet.octopart.com/EVQ-P7A01P-Panasonic-datasheet-98950114.pdf?src-supplier=Newark, ComponentLink16URL=http://datasheet.octopart.com/EVQ-P7A01P-Panasonic-datasheet-98950114.pdf?src-supplier=Newark, ComponentLink17Description=https://datasheet.octopart.com/EVQ-P7A01P-Panasonic-datasheet-22087671.pdf?src-supplier=Electro+Sonic, ComponentLink17URL=https://datasheet.octopart.com/EVQ-P7A01P-Panasonic-datasheet-22087671.pdf?src-supplier=Electro+Sonic, ComponentLink18Description=http://datasheet.octopart.com/EVQ-P7A01P-Panasonic-datasheet-98950114.pdf?src-supplier=Quest, ComponentLink18URL=http://datasheet.octopart.com/EVQ-P7A01P-Panasonic-datasheet-98950114.pdf?src-supplier=Quest, ComponentLink19Description=https://www3.panasonic.biz/ac/e_download/control/switch/light-touch/catalog/sw_lt_eng_3529s_side.pdf?src-supplier=TTI, ComponentLink19URL=https://www3.panasonic.biz/ac/e_download/control/switch/light-touch/catalog/sw_lt_eng_3529s_side.pdf?src-supplier=TTI, ComponentLink20Description=https://www3.panasonic.biz/ac/e_download/control/switch/light-touch/catalog/sw_lt_eng_3529s_side.pdf?src-supplier=NAC+Semi, ComponentLink20URL=https://www3.panasonic.biz/ac/e_download/control/switch/light-touch/catalog/sw_lt_eng_3529s_side.pdf?src-supplier=NAC+Semi, Electrical Life=100000Cycles, Illumination Type=Non-Illuminated, Item Type="Tactile Switch", Lead Free="Lead Free", Manufacturer Part Number=EVQ-P7A01P, Mechanical Life=100000Cycles, Mounting Technology="Surface Mount", Orientation="Right Angle", Packaging="Tape and Reel", Pricing="1=0.28, 10=0.258, 50=0.258, 100=0.213, 1000=0.169, 10000=0.133 (USD)", Radiation Hardening=No, Reach SVHC Compliant=Unknown, RoHS=Yes, Series=EVQP7, Stock=47904, Supplier=Mouser, Switch Function=Off-Mom, Switch Travel=0.2mm, Termination="Gull Wing", Throw Configuration=SPST
U1: "IC REG BOOST 5V 1A 9WLCSP", LCSC Part Number=C890712, Manufacturer="ON Semiconductor / Fairchild", ComponentLink1Description=https://datasheet.ciiva.com/29732/fan48610-29732973.pdf?src-supplier=Digi-Key, ComponentLink1URL=https://datasheet.ciiva.com/29732/fan48610-29732973.pdf?src-supplier=Digi-Key, ComponentLink2Description=https://datasheet.ciiva.com/29732/fan48610-29732983.pdf?src-supplier=Digi-Key, ComponentLink2URL=https://datasheet.ciiva.com/29732/fan48610-29732983.pdf?src-supplier=Digi-Key, ComponentLink3Description=https://datasheet.ciiva.com/30018/fan48610-30018312.pdf?src-supplier=Avnet, ComponentLink3URL=https://datasheet.ciiva.com/30018/fan48610-30018312.pdf?src-supplier=Avnet, Item Type=IC, Manufacturer Part Number=FAN48610UC50X, Pricing="893=0.4144, 900=0.4032, 1800=0.392, 4500=0.3808, 9000=0.3696, 45000=0.3584, 90000=0.3472 (USD)", RoHS=Yes, Stock=1164000, Supplier=Avnet, Supplier Part Number=FAN48610UC50X
U2: "IC SUPERVISOR 1 CHANNEL 6WLP", LCSC Part Number=C1019998, Manufacturer="Analog Devices", Supplier Part Number=700-MAX16150AWT+, Category="Voltage Supervisors", Item Type=IC, Manufacturer Part Number=MAX16150AWT+, Pricing="1=3.1, 10=2.78, 50=2.63, 100=2.28, 1000=1.75, 10000=1.69 (USD)", RoHS=No, Stock=13, Supplier=Mouser
U3: "IC REG LINEAR 3V 300MA 4X2SON", LCSC Part Number=C2870830, Manufacturer="Texas Instruments", Supplier Part Number=595-TLV73330PDQNR, Category="Voltage Regulators - Linear", ComponentLink1Description=http://www.ti.com/general/docs/suppproductinfo.tsp?distId=10&amp;gotoUrl=http%3A%2F%2Fwww.ti.com%2Flit%2Fgpn%2Ftlv733p&src-supplier=Digi-Key, ComponentLink1URL=http://www.ti.com/general/docs/suppproductinfo.tsp?distId=10&amp;gotoUrl=http%3A%2F%2Fwww.ti.com%2Flit%2Fgpn%2Ftlv733p&src-supplier=Digi-Key, Item Type=IC, Manufacturer Part Number=TLV73330PDQNR, Pricing="1=0.39, 10=0.255, 50=0.255, 100=0.137, 1000=0.084, 10000=0.058 (USD)", RoHS=Yes, Stock=14746, Supplier=Mouser
U4: "500MA USB COMPATIBLE SINGLE CELL", LCSC Part Number=C3682710, Manufacturer="ON Semiconductor", Supplier Part Number=488-FAN54120UC420XCT-ND, Item Type=IC, Manufacturer Part Number=FAN54120UC420X, Pricing="1=0.83, 10=0.745, 25=0.7072, 100=0.5429, 250=0.47976, 500=0.4545, 1000=0.3535 (USD)", RoHS=Yes, RoHS Compliant=Yes, Stock=2603, Supplier=Digi-Key
U5: "MOSFET P-CH 20V 3.6A 3LGA", Case/Package=LGA, Continuous Drain Current (ID)=3.6A, Drain to Source Voltage (Vdss)=20V, Input Capacitance=385pF, LCSC Part Number=C2872196, Manufacturer="Texas Instruments", Max Operating Temperature=150°C, Max Power Dissipation=500mW, Min Operating Temperature=-55°C, Supplier Part Number=595-CSD25501F3, Category="Integrated Circuits (ICs)", ComponentLink1Description=http://www.ti.com/lit/ds/symlink/csd25501f3.pdf?src-supplier=Digi-Key, ComponentLink1URL=http://www.ti.com/lit/ds/symlink/csd25501f3.pdf?src-supplier=Digi-Key, ComponentLink2Description=http://www.ti.com/general/docs/suppproductinfo.tsp?distId=10&amp;gotoUrl=http%3A%2F%2Fwww.ti.com%2Flit%2Fgpn%2Fcsd25501f3&src-supplier=Digi-Key, ComponentLink2URL=http://www.ti.com/general/docs/suppproductinfo.tsp?distId=10&amp;gotoUrl=http%3A%2F%2Fwww.ti.com%2Flit%2Fgpn%2Fcsd25501f3&src-supplier=Digi-Key, Element Configuration=Single, Item Type=IC, Manufacturer Part Number=CSD25501F3, Mounting Technology="Surface Mount", Packaging="Cut Tape", Pins=3, Pricing="1=0.45, 10=0.34, 50=0.34, 100=0.212, 1000=0.112, 10000=0.086 (USD)", Rds On Max=76mR, RoHS=Yes, RoHS Compliant=Yes, Series=FemtoFET™, Stock=42227, Supplier=Mouser
U6: "RF TXRX MODULE BT TRACE ANT SMD", Case/Package=Module, Current - Receiving=11.7mA, Current - Transmitting=16mA, Frequency=2.4GHz, Manufacturer="Taiyo Yuden", Max Operating Temperature=85°C, Min Operating Temperature=-40°C, Supplier Part Number=2889504, Category="RF Receivers, Transceivers", ComponentLink1Description=http://www.yuden.co.jp/to/b0060?src-supplier=Digi-Key, ComponentLink1URL=http://www.yuden.co.jp/to/b0060?src-supplier=Digi-Key, Data Rate=1Mbps, Interface=UART, Manufacturer Part Number=EYSHSNZWZ, Memory Size=64KB, Mounting Technology="Surface Mount", Packaging="Cut Tape", Pricing="1=14.18, 10=11.82 (GBP)", RoHS=Yes, RoHS Compliant=Yes, Sensitivity=-94dBm, Series=EYSHSN, Supplier=Farnell
U7: "MOSFET N-CH 20V 224MA 3XLLGA", LCSC Part Number=C179628, Manufacturer="ON Semiconductor", Category=MOSFETs, ComponentLink1Description=https://datasheet.ciiva.com/24010/ntns3193nz-d-260351-24010388.pdf?src-supplier=Mouser, ComponentLink1URL=https://datasheet.ciiva.com/24010/ntns3193nz-d-260351-24010388.pdf?src-supplier=Mouser, ComponentLink2Description=https://datasheet.ciiva.com/30022/ntns3193nz-d-30022416.pdf?src-supplier=Avnet, ComponentLink2URL=https://datasheet.ciiva.com/30022/ntns3193nz-d-30022416.pdf?src-supplier=Avnet, Item Type=IC, Manufacturer Part Number=NTNS3193NZT5G, Pricing="1405=0.26344, 1500=0.25632, 2900=0.2492, 7100=0.24208, 15000=0.23496, 71000=0.22784, 150000=0.22072 (USD)", RoHS=Yes, Stock=720374, Supplier=Avnet, Supplier Part Number=NTNS3193NZT5G
U8: "IMU ACCEL/GYRO I2C/SPI 14LGA", LCSC Part Number=C5368700, Manufacturer="Bosch Sensortec", Supplier Part Number=1168362, Category=Uncategorized, Item Type=IC, Manufacturer Part Number=BMI323, RoHS=No, Supplier="Future Electronics"
U9: "SENSOR FLIPCORE/HALL SPI 12WLCSP", LCSC Part Number=C171681, Manufacturer="Bosch Sensortec", Supplier Part Number=2457371, Category="Magnetic Sensors", ComponentLink1Description=https://datasheet.ciiva.com/18575/bst-bmm150-ds001-01-18575453.pdf?src-supplier=Digi-Key, ComponentLink1URL=https://datasheet.ciiva.com/18575/bst-bmm150-ds001-01-18575453.pdf?src-supplier=Digi-Key, Item Type=IC, Manufacturer Part Number=BMM150, Pricing="5=1.686, 25=1.598, 100=1.49, 500=1.37, 1000=1.262 (GBP)", RoHS=Yes, Stock=780, Supplier=Rs

## Free pads (board coordinates)
  round 0 hole 7.87 unplated: 1(98.4,357.63) 1(128,357.63) 1(142.61,357.63) 1(157.23,357.63) 1(171.84,357.63) 1(201.84,357.63) 1(216.45,357.63) 1(231.07,357.63)

## Via types
v1: diameter 11.81, hole 5.91, Top Layer to Layer 2, 28 vias
v2: diameter 11.81, hole 5.91, Top Layer to Layer 3, 22 vias
v3: diameter 11.81, hole 5.91, Layer 2 to Bottom Layer, 14 vias
v4: diameter 11.81, hole 5.91, Layer 3 to Bottom Layer, 13 vias
v5: diameter 11.81, hole 5.91, Top Layer to Bottom Layer, 10 vias

## Nets (pads, with @x,y where several pads share a name; then routed paths per layer and width w, separated by ;. In a path a pad name is that pad's centre, name@x,y a point inside that pad or via, vN(x,y) a via of type N, cw(c..) or ccw(c..) an arc to the next point about the centre after c; other vN are vias at no path point)
3V: C6.1 C7.2 C9.2 C10.2 C11.2 C12.2 J7.1 R1.2 R10.2 R11.2 R12.2 U3.1 U6.8 U7.1 U8.5 U8.8 U8.12 U9.A1 U9.B2 U9.E5 | length 618.4
  Top Layer w3.54: C10.2@46.06,235.6 C10.2
  Top Layer w4.5: 36.18,294.3 36.18,267.03 U9.E5 C10.2@46.06,235.6
  Top Layer w5.91: U9.B2 79.49,310.95 79.97,311.43
  Top Layer w10: U8.12 151.48,48.95 154.55,45.88 154.55,45.51 168.46,31.6 223.5,31.6 234.42,42.51 234.42,129.53 221.46,142.49 v1(186.51,142.49) R12.2 R12.2@143.53,142.49
  Layer 2 w10: v1@186.17,142.84 v1(186.51,142.49)
  Layer 3 w8: v2(97.69,309.67) 98.42,310.4 101.11,310.4 102.04,311.33 130.73,311.33 136.57,305.49 170.97,305.49 179.37,313.89 v4(179.37,314.25)
  Bottom Layer w6: 186.95,332.52 186.95,448.77 197.17,459 v5(214,459)
  Bottom Layer w7: R10.2@269.12,335.68 R10.2@269.12,337.65 ; C6.1@300.03,268.45 C6.1@303.79,268.45
  other v1: 63.88,22.75 92.88,88.32 62.66,226.55
  other v3: 134.99,183.16
  other v5: 320.59,227.13
5V: C3.2 J4.1 LED1.2 R13.2 U1.A1 U1.A2 U3.4 | length 319.7
  Top Layer w4: LED1.2 85.59,179.8 v2@85.59,190.54
  Layer 3 w4.92: 20.25,158.23 ccw(c35.32,158.23) 24.66,147.58
  Layer 3 w8: 20.25,158.23 v2(20.25,327.54)
  Layer 3 w9: v2(85.59,189.54) 85.59,142.15 93.84,133.91 129.13,133.91 134.99,128.05 v4@134.99,109
  Bottom Layer w4: v4@134.99,112.79 U3.4
  other v4: 134.99,108.93
5V_USB: C4.2 J3.1 R2.2 R5.2 U4.1 | length 149.2
  Top Layer w8: R2.2 115.34,231.09 115.34,229.12 125.41,219.05 233,219.05 247.82,204.23 250.4,204.23
  other v2: 250.59,173 250.59,185.05
  other v4: 236.61,138
AN1: J4.2 U6.23 | length 319.4
  Layer 2 w4.92: v1(20,278.33) 59.76,278.33 114.84,223.26 173.72,223.26 185.63,211.35 230.26,211.35 281.59,262.68 281.59,271.09 v1(281.86,271.36)
AN2: J4.3 U6.9 | length 357.3
  Layer 2 w4.92: v1(20,229.12) 33.23,242.35 67.91,242.35 107.44,202.82 166.33,202.82 177.48,191.67 238.42,191.67 317.47,270.71 v1(317.47,271.3)
AN3: J4.4 U6.10 | length 457.7
  Top Layer w5: J4.4 20.57,179.91 36.84,196.18 36.84,245.16 v1(27.32,254.67)
  Top Layer w10: v1(302.29,301) U6.10
  Layer 2 w4.92: v1(27.32,254.67) 69.5,254.67 111.52,212.66 170.41,212.66 181.56,201.51 234.34,201.51 302.29,269.46 v1(302.29,301)
AN4: J4.5 U6.3 | length 527.4
  Layer 3 w4.92: v2(20,130.69) 20,101.64 29.86,91.78 98.94,91.78 142.86,47.86 230.29,47.86 243.47,61.04 243.47,96.32 265.22,118.08 265.22,200.48 246.38,219.33 246.38,243.87 239.08,251.17 202.76,251.17 v2(202.13,251.79)
AN5: J4.6 U6.24 | length 537.1
  Layer 3 w4.92: v2(20,81.48) 94.87,81.48 138.33,38.02 235.02,38.02 254.46,57.46 254.46,93.4 275.07,114 275.07,204.56 256.22,223.41 256.22,285.8 271.42,301 v2(281.86,301)
BAT_ADC: R6.1 R9.2 U6.4 | length 24.4
  Layer 2 w8: v1(225.76,251.79) 225.76,251.85 242.93,269.03 v3(242.93,269.09)
BAT_STAT: R8.1 U6.5 | length 36.7
  Layer 2 w5: v3(223.89,225.6) v3@223.89,225.95 ; v1@249.38,251.44 v1(249.38,251.79)
  Layer 2 w8: v3@223.89,225.95 v1@249.38,251.44
CLR_POWER: R1.1 U2.B3 U6.25 | length 51.2
  Layer 2 w8: v3(172.09,269.66) 172.09,293.09 176.77,297.78 v1(197.9,297.78)
ENABLE: U1.B3 U2.B1 U3.3 | length 569
  Layer 2 w6: v3@44.85,34.18 65.49,54.82 65.49,119.01 83.99,137.5 163.82,137.5 v5@175.07,126.25
  Layer 3 w4.92: v4@154.49,322.96 83.5,322.96 77.95,317.41 77.95,217.47 99.1,196.32 99.1,166.52 115.58,150.04 169.8,150.04 175.34,144.5 v5(175.34,126.25)
  Bottom Layer w6: v3@43.9,33.92 U1.B3@55.5,33.92
  other v3: 44.85,33.88
  other v4: 154.63,322.82
GND: C1.1 C2.1 C3.1 C4.1 C5.1 C6.2 C7.1 C8.1 C9.1 C10.1 C11.1 C12.1 J2.1 J3.2 J4.7 J7.5 LED1.3 Q1.2 R3.2 R4.1 R9.1 SW1.1 U1.C1 U1.C2 U1.C3 U2.A2 U3.2 U3.5 U4.5 U4.7 U6.1 U6.13 U6.18 U6.26 U8.1 U8.6 U8.7 U9.A5 U9.C1 U9.C5 U9.E1 U9.E3 | length 507
  Top Layer w5: U9.A5 115.87,257.15
  Top Layer w5.91: U9.E3 U9.E1 U9.C1 U9.C5 U9.A5
  Top Layer w6: C11.1@115.62,276.73 C11.1@116.6,277.7 ; C11.1 116.72,278.71 v1(125.12,278.66) v1(125.12,278.66) ; U6.18 v1(161.23,336.43)
  Top Layer w8: U6.26 255.01,286.24 262.18,293.41 262.18,311.6 271.1,320.52 271.1,329.61 U6.13 ; v2@277.42,319.74 v2(277.64,319.96)
  Top Layer w10: U8.1@141.24,114.31 v2@149.97,114.31
  Layer 2 w6: v1(125.12,278.66) v1@126.23,279.77
  Layer 3 w8: v4(269.51,272) 286.11,272 296.94,282.83 v4(296.94,313.45) 290.43,319.96 v2(277.64,319.96)
  Bottom Layer w4: v5(20,32.27) 20,20.51 21.08,19.43 C2.1 ; C2.1@22.04,17.43 C2.1@35.7,17.43
  Bottom Layer w5: SW1.1@86.54,319.87 SW1.1@94.46,327.78
  Bottom Layer w6: 114,338.65 v5(114,459)
  Bottom Layer w10: v4@196.25,133.65 196.25,115.43 196.43,115.26
  other v1: 62.89,146.17 206.18,164.16 218.75,164.03 205.98,176.38 218.75,176.38 149.97,246.39
  other v2: 152.97,112.31
  other v3: 314.23,24.95 314.23,43.72 288.93,173.99 121.84,255.92 122.76,294.41
  other v4: 193.24,135.62 148.17,136.75
HV_LED_DATA: LED1.4 R13.1 U7.3
LED_DATA: R12.1 U6.22 U7.2 | length 170.3
  Top Layer w8: U6.22 185.25,276.24 212.9,276.24 219.49,269.65 v2(219.49,269.45)
  Layer 3 w4.92: v2(157.36,189.53) 174.38,189.53 181.73,196.89 181.73,257.16 189.65,265.08 213.25,265.08 217.62,269.45 v2(219.49,269.45)
NetC8_2: C8.2 U6.7 | length 17.5
  Layer 3 w8: v4@275.56,226.67 292.43,226.67 v2(292.89,227.13)
  other v4: 275.56,226.21
NetL1_1: L1.1 U1.B1 U1.B2 | length 94.8
  Layer 2 w14: 113.78,34.32 113.78,93.69 ; 113.78,93.76 v3(113.78,99.69) v3(113.78,113.14)
  Bottom Layer w6: U1.B1 103.04,33.97
  other v3: 113.47,42
NetQ1_1: Q1.1 R8.2
NetQ1_3: Q1.3 R7.2 U5.1
NetR3_1: R3.1 U4.2
NetR5_1: R5.1 U4.3
NetSW1_2: SW1.2 U2.A3 | length 46.5
  Bottom Layer w4: SW1.2@29.46,319.87 29.46,288.1 39.9,277.66
NetU6_11: U6.11 U6.12
POWER_DET: R2.1 R4.2 U6.21 | length 8.2
  Top Layer w5: R2.1 92.37,235.35 93.36,235.35 95.19,237.19 R2.1@95.19,238.17 ; v1@138.66,262.13 v1(139.14,262.61)
RST: J7.3 U6.19 | length 191.2
  Layer 2 w4.92: 114,342.09 114,336.57 129.71,320.86 v1(139.14,320.86)
  Layer 2 w5: 114,342.09 114,367 125.16,378.16 125.16,448.25 135.91,459 v5(164,459)
RX: J5.1 U6.20 | length 107.1
  Top Layer w10: v1(79.42,333.51) J5.1
  Layer 2 w4.92: v1(79.42,333.51) 102.83,333.51 139.92,296.42 139.92,286.45 v1(140.14,286.24)
SCL: R11.1 U6.15 U8.13 U9.A3 | length 504.9
  Top Layer w5.91: U9.A3@91.16,279.43 U9.A3 v2(98.42,284.79) v2@97.29,283.66 ; v2@99.29,284.66 v2@100.42,285.79
  Layer 3 w4.92: v2(164.98,68.1) 164.98,78.54 206.64,120.2 206.64,146.6 193.35,159.88 119.66,159.88 108.94,170.6 108.94,200.4 88.13,221.21 88.13,274.71 98.22,284.79 v2(98.42,284.79) 112.44,284.79 116.11,281.12 142.85,281.12 155.17,293.45 184.25,293.45 198.41,307.6 212.68,307.6 v2(225.76,320.69)
  Layer 3 w6: v4@222.31,334.11 225.26,331.17 v2@225.26,321.18
  Layer 3 w8: v4@222.31,334.11 v4(222.31,335.15) ; v2@225.26,321.18 v2(225.76,320.69)
SDA: R10.1 U6.14 U8.14 U9.B4 | length 520.4
  Top Layer w6: U9.B4 79.85,268.65 100.87,268.65 v2(101.51,269.3)
  Top Layer w8: 167.51,89.43 167.51,90.12 169.61,92.21 170.29,92.21 183.75,105.67 v2(216.64,105.67)
  Layer 3 w4.92: v2(101.51,269.3) v2@101.42,269.2 ; v2(216.64,105.67) 216.64,150.51 197.29,169.87 123.59,169.87 118.79,174.67 118.79,205.12 101.42,222.49 v2@101.42,269.2 ; v2@248.06,322 v2(249.38,320.69) 225.23,296.54 201.26,296.54 188.33,283.6 159.25,283.6 144.85,269.2 v2@101.42,269.2
  Layer 3 w6: v4(241.07,335.15) 248.06,328.15 v2@248.06,322
SWDCLK: J7.4 U6.16 | length 118.5
  Layer 3 w5: v5(164,409) 179.12,409 186.95,401.18 186.95,326.17 192.31,320.81 201.93,320.81 v2(202.01,320.89)
SWDIO: J7.2 U6.17 | length 113
  Layer 2 w5: v1(178.51,320.69) 186.95,329.12 186.95,399.02 196.92,409 v5(214,409)
TX: J6.1 U6.2 | length 203.2
  Layer 2 w4.92: v1(51.21,333.51) 51.21,300.81 118.91,233.1 172.44,233.1 178.51,239.17 v1(178.51,251.79)
V_MON: R6.2 U5.3
VBAT: C1.2 C2.2 C5.2 J1.1 L1.2 R7.1 U1.A3 U2.A1 U4.6 U5.2 | length 503.9
  Layer 2 w4.92: v2(35.08,162.59) cw(c23.69,151.19) 39.8,151.19 39.8,147.58 ccw(c41.55,145.83) 39.08,145.83 v3(39.08,63.7)
  Layer 3 w4.92: v2(35.08,162.59) 35.08,174.04 cw(c60.36,174.04) 42.49,191.91
  Layer 3 w5.91: v4(202.01,278.49) 209.22,285.7 239.93,285.7 263.74,309.51 263.74,329.63 269.69,335.58 308.79,335.58 314.72,329.65 314.72,282.79 306.71,274.79 306.71,138.79 300.88,132.95 v5(300.88,132.38)
  Bottom Layer w8: U2.A1 138.88,328.8
  other v4: 157.92,338.65
  other v5: 279.67,22.97
pads on no net: J3.MH J7.6 J7.MP1 J7.MP2 J7.MP3 LED1.1 U2.B2 U4.4 U6.6 U6.27 U6.28 U8.2 U8.3 U8.4 U8.9 U8.10 U8.11 U9.D2 U9.D4

## Polygon pours and split planes (outlines as drawn)
GND on Bottom Layer "GND_L04_P008" (solid, pour order 8): 170.89,8.34 170.89,259 324.61,259 324.61,8.34
GND on Bottom Layer "GND_L04_P004" (solid, pour order 4): 30.33,507.34 298.25,507.34 298.25,371.08 30.33,371.08
GND on Layer 3 "GND_L03_P000" (solid, remove dead copper, pour order 0): 4,350.33 325.82,350.33 325.82,3.69 4,3.69
VBAT on Layer 3 "VBAT_L03_P009" (solid, pour order 9): 81.48,147.58 81.48,316.04 88.67,323.23 181.37,323.23 181.37,344.43 20.28,344.43 20.28,147.58
5V_USB on Layer 3 "5V_USB_L03_P011" (solid, pour order 11): 181.73,253 182.95,251.79 270.7,251.79 270.7,123.56 240.84,93.7 180.13,93.7 180.13,251.4
VBAT on Layer 3 "VBAT_L03_P016" (solid, pour order 16): 136.71,39.63 92.18,84.17 13.7,84.17 10.16,80.63 10.16,80.9 4,74.75 4,3.69 290.78,3.69 290.78,34.48 238.56,34.48 233.41,39.63
5V on Layer 3 "5V_L03_P010" (solid, pour order 10): 94.87,158.56 112.01,141.41 136.12,141.41 141.53,135.89 141.53,89.23 11.11,89.41 10.92,89.23 10.92,158.56
3V on Layer 2 "3V_L02_P013" (solid, pour order 13): 40.66,234.7 39.08,233.12 39.08,123.56 201.84,123.56 201.84,220.32 187.46,234.7
GND on Layer 2 "GND_L02_P003" (solid, remove dead copper, pour order 3): 4,343.83 325.82,343.83 325.82,3.69 4,3.69
VBAT on Layer 2 "VBAT_L02_P014" (solid, pour order 14): 55.67,226 62.98,218.69 65.49,216.17 65.49,17.93 51.26,3.69 4,3.69 4,226